# Altium PCB DemoProject_PCB.PcbDoc
Units mil, origin at the board's own origin, x right, y up, seen from the top; angles counter-clockwise.
Board outline 6000 x 4000 mil, 2 copper layers (Top Layer, Bottom Layer); 13 components, 40 nets, 86 pads, 2 vias.
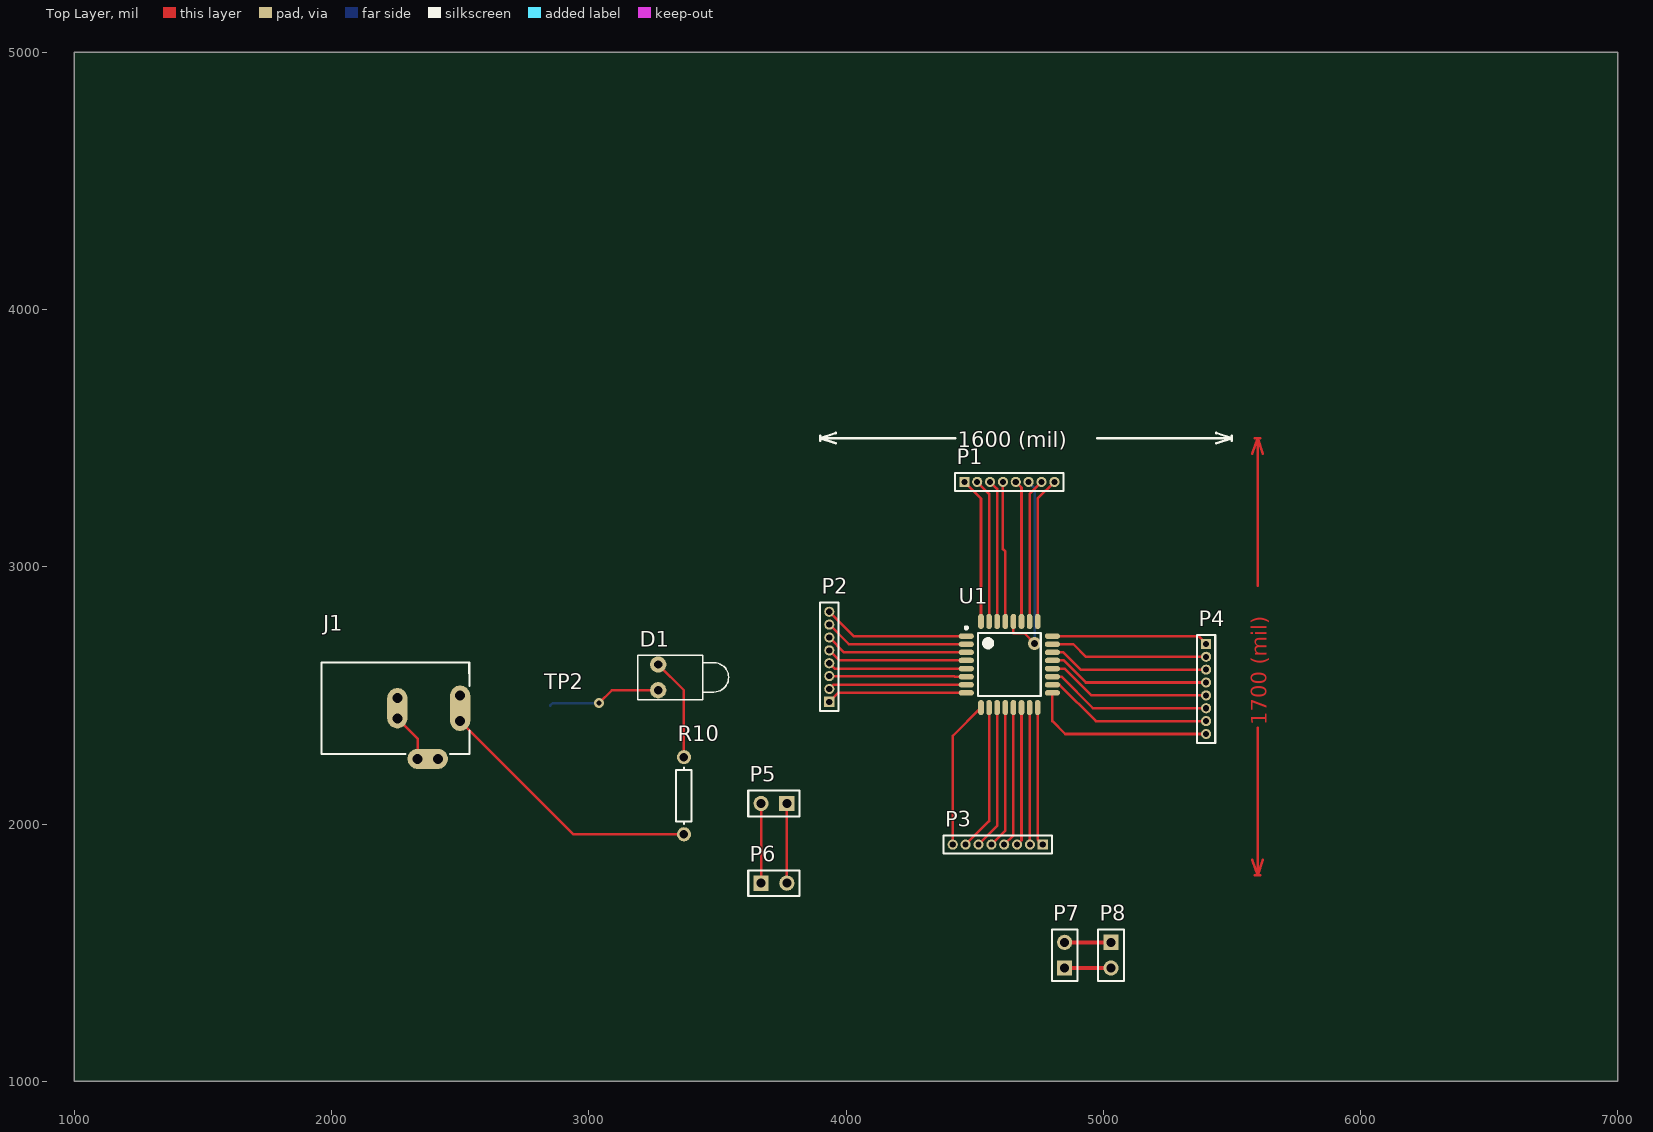
[diagram p0: Top Layer view]
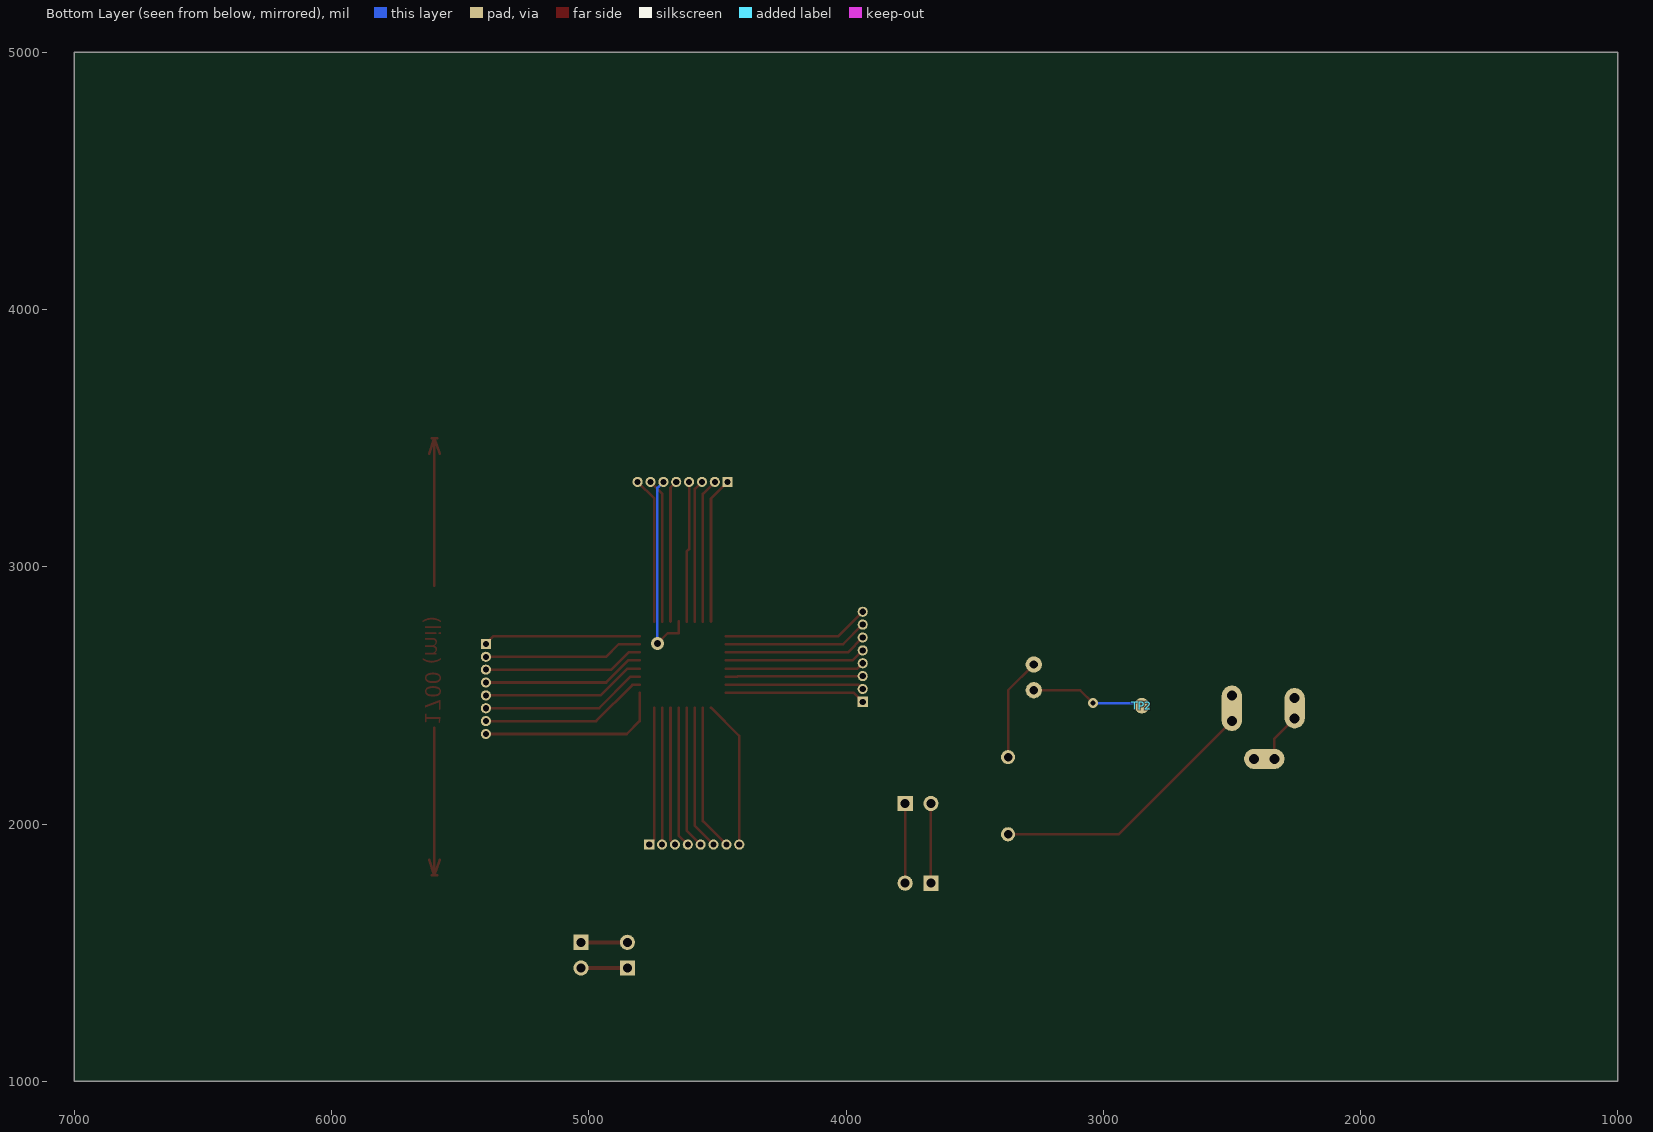
[diagram p1: Bottom Layer view, seen from below]

## Layer stack, top to bottom
Top Solder: solder mask 0.4, Solder Resist, Dk 3.5
Top Layer: signal copper 1.4
Dielectric 1: dielectric 12.6, FR-4, Dk 4.8
Bottom Layer: signal copper 1.4
Bottom Solder: solder mask 0.4, Solder Resist, Dk 3.5

## Board outline
1000,1000 7000,1000 7000,5000 1000,5000

## Design rules (kind name [scope] priority, off if disabled: settings)
Clearance [All] p1: gap=10 ignorepadtopadclearanceinfootprint=FALSE except(0: Arc-Hole Track-Hole SMDPad-Hole THPad-Hole Via-Hole Fill-Hole Poly-Hole Region-Hole Text-Hole)
DiffPairsRouting [All] p1: maxlimit=10 minlimit=10 mostfreqgap=10 toplayer_minwidth=15 toplayer_maxwidth=15 toplayer_prefwidth=15 bottomlayer_minwidth=15 bottomlayer_maxwidth=15 bottomlayer_prefwidth=15 maxuncoupledlength=500
FabricationTestpoint [All] p1: side=3 testpointundercomponent=TRUE minsize=40 maxsize=100 preferedsize=60 minholesize=0 maxholesize=40 preferedholesize=32 testpointgrid=1 allowsidetop=TRUE allowsidebottom=TRUE usegrid=FALSE gridtolerance=0.01
MatchedLengths [InNetClass('SouthBus')] p1: tolerance=10 checknetsindiffpair=FALSE checkdiffpairvsdiffpair=TRUE checkxsignals=TRUE checkothers=TRUE
PolygonConnect [All] p1: connectstyle=Relief reliefconductorwidth=10 reliefentries=4 polygonreliefangle="90 Angle" airgapwidth=10
RoutingVias [All] p1: holewidth=28 width=50 viastyle="Through Hole" minholewidth=28 minwidth=50 maxholewidth=28 maxwidth=50
SolderMaskExpansion [All] p1: expansion=4
Width [All] p1: maxlimit=10 minlimit=10 preferedwidth=10
28 further rules are at their usual default settings.

## Classes and differential pairs
differential pair class DummyPair: H
net class Jum2Jump: H_N H_P
net class Bus[0..1]: Bus0 Bus1
net class Left_bus: NetP2_1 NetP2_2 NetP2_3 NetP2_4 NetP2_5 NetP2_6 NetP2_7 NetP2_8
component class "[2] Page 2": D1 J1 P1 P2 P3 P5 P6 P7 P8 R10 TP2 U1
component class "[1] Page 1": P4
net class SouthBus: L1 L2 L3 L4 L5 L6 L7 L8
differential pair H: +H_P -H_N

## Components (designator, comment, footprint, x,y, rotation, side; value= is the part's Value field where it differs from the comment)
D1 "LED1" LED-1 3270,2570 r0 top locked
J1 "PWR2.5" KLD-0202 1960.63,2450 r0 top locked
P1 "MHDR1X8" MHDR1X8 4460,3330 r0 top
P2 "MHDR1X8" MHDR1X8 3935,2475 r90 top
P3 "MHDR1X8" MHDR1X8 4765,1920 r180 top
P4 "MHDR1X8" MHDR1X8 5400,2700 r270 top
P5 "Header 1" HDR1X2 3770,2080 r180 top locked
P6 "Header 2" HDR1X2 3670,1770 r0 top locked
P7 "Header 1" HDR1X2 4850,1440 r90 top locked
P8 "Header 1" HDR1X2 5030,1540 r270 top
R10 "Res1" AXIAL-0.3 3370,2110 r90 top locked value=1K
TP2 "Test Point" PCBComponent_1 2850,2460 r0 top
U1 "ATMEGA328P-AU" TQFP80P900X900X120-32N 4635,2620 r0 top

## Footprints (in the part's own frame and the unit in brackets; to place one, negate y for a bottom-side part, rotate by r counter-clockwise, add the part's x,y. Pads: shape width x height; smd on the part's side, far side on the other; paste and mask are expansions set on the pad)
AXIAL-0.3 [mm] "Axial Device, Thru-Hole; 2 Leads; 0.3 in Pin Spacing"
  round 1.4 hole 0.85: 1(-3.81,0) 2(3.81,0)
  silkscreen extent -2.77,-0.76 2.77,0.76
HDR1X2 [mm] "Connector; Header; 2 Position"
  rect 1.5x1.5 hole 0.9: 1(0,0)
  round 1.5 hole 0.9: 2(2.54,0)
  silkscreen extent -1.27,-1.27 3.81,1.27
KLD-0202 [mm] "DC Power Jack, 2.5mm, KLD Series, PCB Mount"
  oval 2x4.5 all layers, no hole: 1(13.7,0)
  round 1.5 hole 1: 1A(13.7,-1.25) 1B(13.7,1.25) 2A(7.5,-1) 2B(7.5,1) 3A(9.5,-5) 3B(11.5,-5)
  oval 2x4 all layers, no hole: 2(7.5,0)
  oval 4x2 all layers, no hole: 3(10.5,-5)
  silkscreen extent 0,-4.5 14.6,4.5
LED-1 [mm] "LED; 2 Leads"
  round 1.6 hole 0.8: 1(0,1.27) 2(0,-1.27)
  silkscreen extent -2,-2.2 6.95,2.2
MHDR1X8 [mm] "Connector; Header; 8 Position"
  rect 1x1 hole 0.6: 1(0,0)
  round 1 hole 0.6: 2(1.27,0) 3(2.54,0) 4(3.81,0) 5(5.08,0) 6(6.35,0) 7(7.62,0) 8(8.89,0)
  silkscreen extent -0.9,-0.9 9.79,0.9
PCBComponent_1 [mil]
  round 60 smd far side: TP(0,0)
TQFP80P900X900X120-32N [mm] "TQFP, 32-Leads, Body 7.00x7.00mm, Pitch 0.80mm, IPC Medium Density"
  oval 1.5x0.55 smd: 1(-4.25,2.8) 2(-4.25,2) 3(-4.25,1.2) 4(-4.25,0.4) 5(-4.25,-0.4) 6(-4.25,-1.2) 7(-4.25,-2) 8(-4.25,-2.8) 17(4.25,-2.8) 18(4.25,-2) 19(4.25,-1.2) 20(4.25,-0.4) 21(4.25,0.4) 22(4.25,1.2) 23(4.25,2) 24(4.25,2.8)
  oval 0.55x1.5 smd: 9(-2.8,-4.25) 10(-2,-4.25) 11(-1.2,-4.25) 12(-0.4,-4.25) 13(0.4,-4.25) 14(1.2,-4.25) 15(2,-4.25) 16(2.8,-4.25) 25(2.8,4.25) 26(2,4.25) 27(1.2,4.25) 28(0.4,4.25) 29(-0.4,4.25) 30(-1.2,4.25) 31(-2,4.25) 32(-2.8,4.25)
  silkscreen extent -4.37,-3.1 3.1,3.75, body extent -3.5,-3.5 3.5,3.5, height 1.2

## Part data
D1: "Typical RED GaAs LED", LatestRevisionDate=08-Jul-2005, LatestRevisionNote="Mech Layer 1 removed.", PackageDescription="LED; 2 Leads", PackageReference=LED-1, Published=8-Jun-2000, Publisher="Altium Limited"
J1: "Low Voltage Power Supply Connector", ComponentLink1Description="Manufacturer Link", ComponentLink1URL=http://domino.kycon.com/internet/Products.html, DatasheetDocument=09-May-2002, Published=17-Dec-2003, Publisher="Altium Limited"
P1 P2 P4: "Header, 8-Pin", LatestRevisionDate=17-Jul-2002, LatestRevisionNote="Re-released for DXP Platform.", Publisher="Altium Limited"
P3: "Header, 8-Pin", Supplier Part Number 1=1715486, LatestRevisionDate=17-Jul-2002, LatestRevisionNote="Re-released for DXP Platform.", Publisher="Altium Limited", Supplier 1=Farnell
P5 P7 P8: library part "Header 2", "Header, 2-Pin", LatestRevisionDate=17-Jul-2002, LatestRevisionNote="Re-released for DXP Platform.", Publisher="Altium Limited"
P6: "Header, 2-Pin", LatestRevisionDate=17-Jul-2002, LatestRevisionNote="Re-released for DXP Platform.", Publisher="Altium Limited"
R10: "Resistor", LatestRevisionDate=17-Jul-2002, LatestRevisionNote="Re-released for DXP Platform.", PackageDescription="Axial Device, Thru-Hole; 2 Leads; 0.3 in Pin Spacing", PackageReference=AXIAL-0.3, Published=8-Jun-2000, Publisher="Altium Limited"
TP2: library part TP
U1: "Microchip Technology ATMEGA328P-AU, 8bit AVR Microcontroller, 20MHz, 32 kB Flash, 32-Pin TQFP", Manufacturer=Microchip, Manufacturer Part Number=PIC24HJ256GP206A-I/PT, Maximum Frequency=40MIPS, Maximum Operating Temperature="+85 °C", MCU Case Style=TQFP, Minimum Operating Temperature="-40 °C", Operating Temperature Max=85, Operating Temperature Min=-40, Operating Temperature Range="-40°C to +85", Supplier Part Number 1=6670295, Supply Voltage Max=5.5, Supply Voltage Min=1.8, Supply Voltage Range="1.8V to 5.5V<!--FANDB--><div class=\"features-and-benefits-container\"><div class=\"features-and-benefits-description\"><span class=\"features-benefits-value\">The high-performance Atmel picoPower 8-bit AVR RISC-based microcontroller combines 32KB ISP flash memory with read-while-write capabilities, 1024B EEPROM, 2KB SRAM, 23 general purpose I/O lines, 32 general purpose working registers, three flexible timer/counters with compare modes, internal and external interrupts, serial programmable USART, a byte-oriented 2-wire serial interface, SPI serial port, a 6-channel 10-bit A/D converter (8-channels in TQFP and QFN/MLF packages), programmable watchdog timer with internal oscillator, and five software selectable power saving modes. The device operates between 1.8-5.5 volts.</span></div><div class=\"features-and-benefits-list\"><ul class=\"features-and-benefits-list-list\"><li class=\"features-and-benefits-list-item\">High Performance, Low Power Atmel&reg", Typical Operating Supply Voltage="3 ? 3.6 V", ADC Channels=18, ADC Resolution="10 bit, 12 bit", ADCs="18 x 10/12 bit", Automotive Qualification Standard=-, Base Number=megaAVR, ComponentLink1Description=https://datasheet.ciiva.com/7665/70592b-7665720.pdf, ComponentLink1URL=https://datasheet.ciiva.com/7665/70592b-7665720.pdf, ComponentLink2Description=https://datasheet.ciiva.com/41454/001084738-da-01-en-ic-mcu-pic24hj256gp206a-i-pt-tqfp-64-mcp-41454056.pdf, ComponentLink2URL=https://datasheet.ciiva.com/41454/001084738-da-01-en-ic-mcu-pic24hj256gp206a-i-pt-tqfp-64-mcp-41454056.pdf, ComponentLink3Description=https://datasheet.ciiva.com/6656/70592d-6656821.pdf, ComponentLink3URL=https://datasheet.ciiva.com/6656/70592d-6656821.pdf, ComponentLink4Description=https://datasheet.ciiva.com/16289/70592d-16289717.pdf, ComponentLink4URL=https://datasheet.ciiva.com/16289/70592d-16289717.pdf, ComponentLink5Description=https://datasheet.ciiva.com/14131/pic24hjxxxgpx06a-x08a-x10a-eng-datasheet-14131719.pdf, ComponentLink5URL=https://datasheet.ciiva.com/14131/pic24hjxxxgpx06a-x08a-x10a-eng-datasheet-14131719.pdf, ComponentLink6Description=https://datasheet.ciiva.com/16877/70047449-16877383.pdf, ComponentLink6URL=https://datasheet.ciiva.com/16877/70047449-16877383.pdf, ComponentLink7Description=https://datasheet.ciiva.com/6128/1669484-6128859.pdf, ComponentLink7URL=https://datasheet.ciiva.com/6128/1669484-6128859.pdf, ComponentLink8Description=http://bcove.me/gu8hm7kh, ComponentLink8URL=http://bcove.me/gu8hm7kh, ComponentLink9Description=http://www.farnell.com/datasheets/2295887.pdf, ComponentLink9URL=http://www.farnell.com/datasheets/2295887.pdf, ComponentLink10Description=http://www.farnell.com/cad/1774115.zip, ComponentLink10URL=http://www.farnell.com/cad/1774115.zip, ComponentLink11Description=http://www.farnell.com/datasheets/2156759.pdf, ComponentLink11URL=http://www.farnell.com/datasheets/2156759.pdf, Controller Family/Series=ATmega, CPU Speed=20, Create Date=2018, Created by="altay brusan", Data Bus Width=16bit, Datasheet URL=https://docs-emea.rs-online.com/webdocs/15b8/0900766b815b8e7b.pdf, Device Core=PIC, Dimensions="10 x 10 x 1.05mm", EEPROM Memory Size=1, Embedded Interface Type=I2, Family Name=PIC24HJ, Height=1.05mm, Instruction Set Architecture=RISC, Length=10mm, MCU Family=megaAVR, MCU Series=ATmega328, Mounting Type="Surface Mount", MPU Core Size=8, MSL="MSL 3 - 168 hours", No. of ADC Inputs=8, No. of I/O's=23, No. of Pins=32, No. of PWM Channels=6, No. of Timers=3, Number of ADC Units=1, Number of I2C Channels=2, Number of PWM Units=1, Number of SPI Channels=2, Number of Timers=9, Number of UART Channels=2, Oscillator Type="External, Internal", Package Type=TQFP, Packaging=Each, Peripherals="ADC, Comparator, RTC", Pin Count=64, Pricing 1="1=5.58, 10=4.64, 25=4.25, 100=3.98 (EUR)", Pricing 2="1=1.58, 25=1.45, 100=1.31, 1000=1.28 (GBP)", Product Range="AVR Family ATmega328 Series Microcontrollers", Program Memory Size="256 kB", Program Memory Type=Flash, Pulse Width Modulation="8 x16 bit", PWM Channels=8, PWM Resolution=16bit, RAM Memory Size=2, RAM Size="16 kB", RoHS=YES, RoHS Phthalates Compliant=Yes, RS stock no.=131-0271, Stock 1=5, Stock 2=3290, Supplier 1=RSComponents, Supplier 2=Farnell, Supplier Part Number 2=1715486, SVHC="No SVHC (17-Dec-2015)", Timer Resolution=16bit, Timers="9 x 16 bit", Width=10mm

## Via types
v1: diameter 40, hole 20, Top Layer to Bottom Layer, 1 vias
v2: diameter 50, hole 28, Top Layer to Bottom Layer, 1 vias

## Nets (pads, with @x,y where several pads share a name; then routed paths per layer and width w, separated by ;. In a path a pad name is that pad's centre, name@x,y a point inside that pad or via, vN(x,y) a via of type N, cw(c..) or ccw(c..) an arc to the next point about the centre after c; other vN are vias at no path point)
A2: P1.8 U1.25 | length 569.5
  Top Layer w10: U1.25 4745.24,3265.24 P1.8
A3: P1.7 U1.26 | length 561.8
  Top Layer w10: U1.26 4713.74,3283.74 P1.7
A4: P1.5 U1.27 | length 551.9
  Top Layer w10: P1.5 4682.24,3307.76 U1.27
A5: P1.6 U1.28 | length 781.7
  Top Layer w10: U1.28 4650.75,2742 4693,2742 v2(4733,2702)
  Bottom Layer w10: P1.6 4733,3307 v2(4733,2702)
D0: P1.3 U1.30 | length 554.2
  Top Layer w10: P1.3 4587.76,3302.24 U1.30
D1: P1.2 U1.31 | length 561.8
  Top Layer w10: P1.2 4556.26,3283.74 U1.31
D2: P1.1 U1.32 | length 569.5
  Top Layer w10: P1.1 4524.76,3265.24 U1.32
DemoColor: D1.1 R10.2 | length 401.4
  Top Layer w10: D1.1 3370,2520 R10.2
H_N: P7.1 P8.2 | length 180
  Top Layer w15: P7.1 P8.2
H_P: P7.2 P8.1 | length 180
  Top Layer w15: P7.2 P8.1
L1: P3.8 U1.9 | length 578.1
  Top Layer w10: P3.8 4415,2342.91 U1.9
L2: P3.7 U1.10 | length 570.5
  Top Layer w10: P3.7 4556.26,2011.26 U1.10
L3: P3.6 U1.11 | length 562.8
  Top Layer w10: P3.6 4587.76,1992.76 U1.11
L4: P3.5 U1.12 | length 555.1
  Top Layer w10: P3.5 4619.25,1974.25 U1.12
L5: P3.4 U1.13 | length 547.5
  Top Layer w10: P3.4 4650.75,1955.75 U1.13
L6: P3.3 U1.14 | length 539.8
  Top Layer w10: P3.3 4682.24,1937.24 U1.14
L7: P3.2 U1.15 | length 533.2
  Top Layer w10: U1.15 4713.74,2187.26 4715,2186 P3.2
L8: P3.1 U1.16 | length 540.9
  Top Layer w10: U1.16 4745.24,1939.76 P3.1
NetD1_2: D1.2 TP2.TP | length 459
  Top Layer w10: v1@3030,2460 v1(3040,2470) 3090,2520 D1.2
  Bottom Layer w10: TP2.TP 2860,2470 v1(3040,2470)
NetJ1_1: J1.1 J1.1A J1.1B R10.1 | length 1151
  Top Layer w10: J1.1B J1.1 J1.1A 2940.79,1960 R10.1
NetJ1_2: J1.2 J1.2A J1.2B J1.3 J1.3A J1.3B | length 347.6
  Top Layer w10: J1.2B J1.2 J1.2A 2334.65,2331.89 J1.3A
  Bottom Layer w10: J1.3A J1.3 J1.3B
NetP2_1: P2.1 U1.8 | length 547.1
  Top Layer w10: P2.1 3969.76,2509.76 U1.8
NetP2_2: P2.2 U1.7 | length 539.4
  Top Layer w10: P2.2 3951.26,2541.26 U1.7
NetP2_3: P2.3 U1.6 | length 533.6
  Top Layer w10: P2.3 4420.76,2575 4423,2572.76 U1.6
NetP2_4: P2.4 U1.5 | length 541.3
  Top Layer w10: P2.4 3955.75,2604.25 U1.5
NetP2_5: P2.5 U1.4 | length 548.9
  Top Layer w10: P2.5 3974.25,2635.75 U1.4
NetP2_6: P2.6 U1.3 | length 556.6
  Top Layer w10: P2.6 3992.76,2667.24 U1.3
NetP2_7: P2.7 U1.2 | length 564.3
  Top Layer w10: P2.7 4011.26,2698.74 U1.2
NetP2_8: P2.8 U1.1 | length 571.9
  Top Layer w10: P2.8 4029.76,2730.24 U1.1
NetP4_1: P4.1 U1.24 | length 610.2
  Top Layer w10: U1.24 5369.76,2730.24 P4.1
NetP4_2: P4.2 U1.23 | length 617.9
  Top Layer w10: U1.23 4883.5,2698.74 4932.24,2650 P4.2
NetP4_3: P4.3 U1.22 | length 625.5
  Top Layer w10: U1.22 4845,2667.24 4912.24,2600 P4.3
NetP4_4: P4.4 U1.21 | length 633.2
  Top Layer w10: U1.21 4847,2635.75 4932.75,2550 P4.4
NetP4_5: P4.5 U1.20 | length 640.9
  Top Layer w10: U1.20 4850.21,2604.25 4954.46,2500 P4.5
NetP4_6: P4.6 U1.19 | length 648.5
  Top Layer w10: U1.19 4837,2572.76 4959.76,2450 P4.6
NetP4_7: P4.7 U1.18 | length 656.2
  Top Layer w10: U1.18 4830,2541.26 4971.26,2400 P4.7
NetP4_8: P4.8 U1.17 | length 728.2
  Top Layer w10: U1.17 4802.32,2400 4852.32,2350 P4.8
P0: P5.2 P6.1 | length 310
  Top Layer w10: P6.1 P5.2
P1: P5.1 P6.2 | length 310
  Top Layer w10: P6.2 P5.1
RST: P1.4 U1.29 | length 546.5
  Top Layer w10: P1.4 4610,3068.25 4619.25,3059 U1.29
copper on no net: | length 1441.2
  Top Layer w10: 5580,1860 5600,1800 ; 5580,3440 5600,3500 ; 5590,1800 5610,1800 ; 5590,3500 5610,3500 ; 5600,2374.08 5600,1800 ; 5600,2925.92 5600,3500 ; 5620,1860 5600,1800 ; 5620,3440 5600,3500

## Other copper
Top Layer:
  text "1700 (mil)" at 5635.99,2384.08 h60 r90

## Silkscreen, mask and mechanical layers (free items; w line width, h text height)
Top Overlay:
  lines w10: 3900,3490 3900,3510 ; 3960,3480 3900,3500 ; 3960,3520 3900,3500 ; 4424.08,3500 3900,3500 ; 4975.92,3500 5500,3500 ; 5440,3480 5500,3500 ; 5440,3520 5500,3500 ; 5500,3490 5500,3510
  text "1600 (mil)" at 4434.08,3464.01 h60

## Text inside footprints (layer, text, board x,y; h text height)
J1: Mechanical 1 "Mech 2 - Clearance, move to internal plane if present" at 1971.89,2649.44 h11.81; Mechanical 1 "Mech 1 - Slot cut-out" at 1971.89,2669.13 h11.81; Mechanical 1 "Assign keep-out area to slot" at 1971.89,2708.5 h11.81; Mechanical 1 "Alert PCB fab to slot details" at 1971.89,2688.82 h11.81